# Altium PCB PCB2.PcbDoc
Units mil, origin at the board's own origin, x right, y up, seen from the top; angles counter-clockwise.
Board outline 6000 x 4000 mil, 2 copper layers (Top Layer, Bottom Layer); 13 components, 7 nets, 29 pads, 0 vias.
Unrouted connection lines stored in the file: 7.
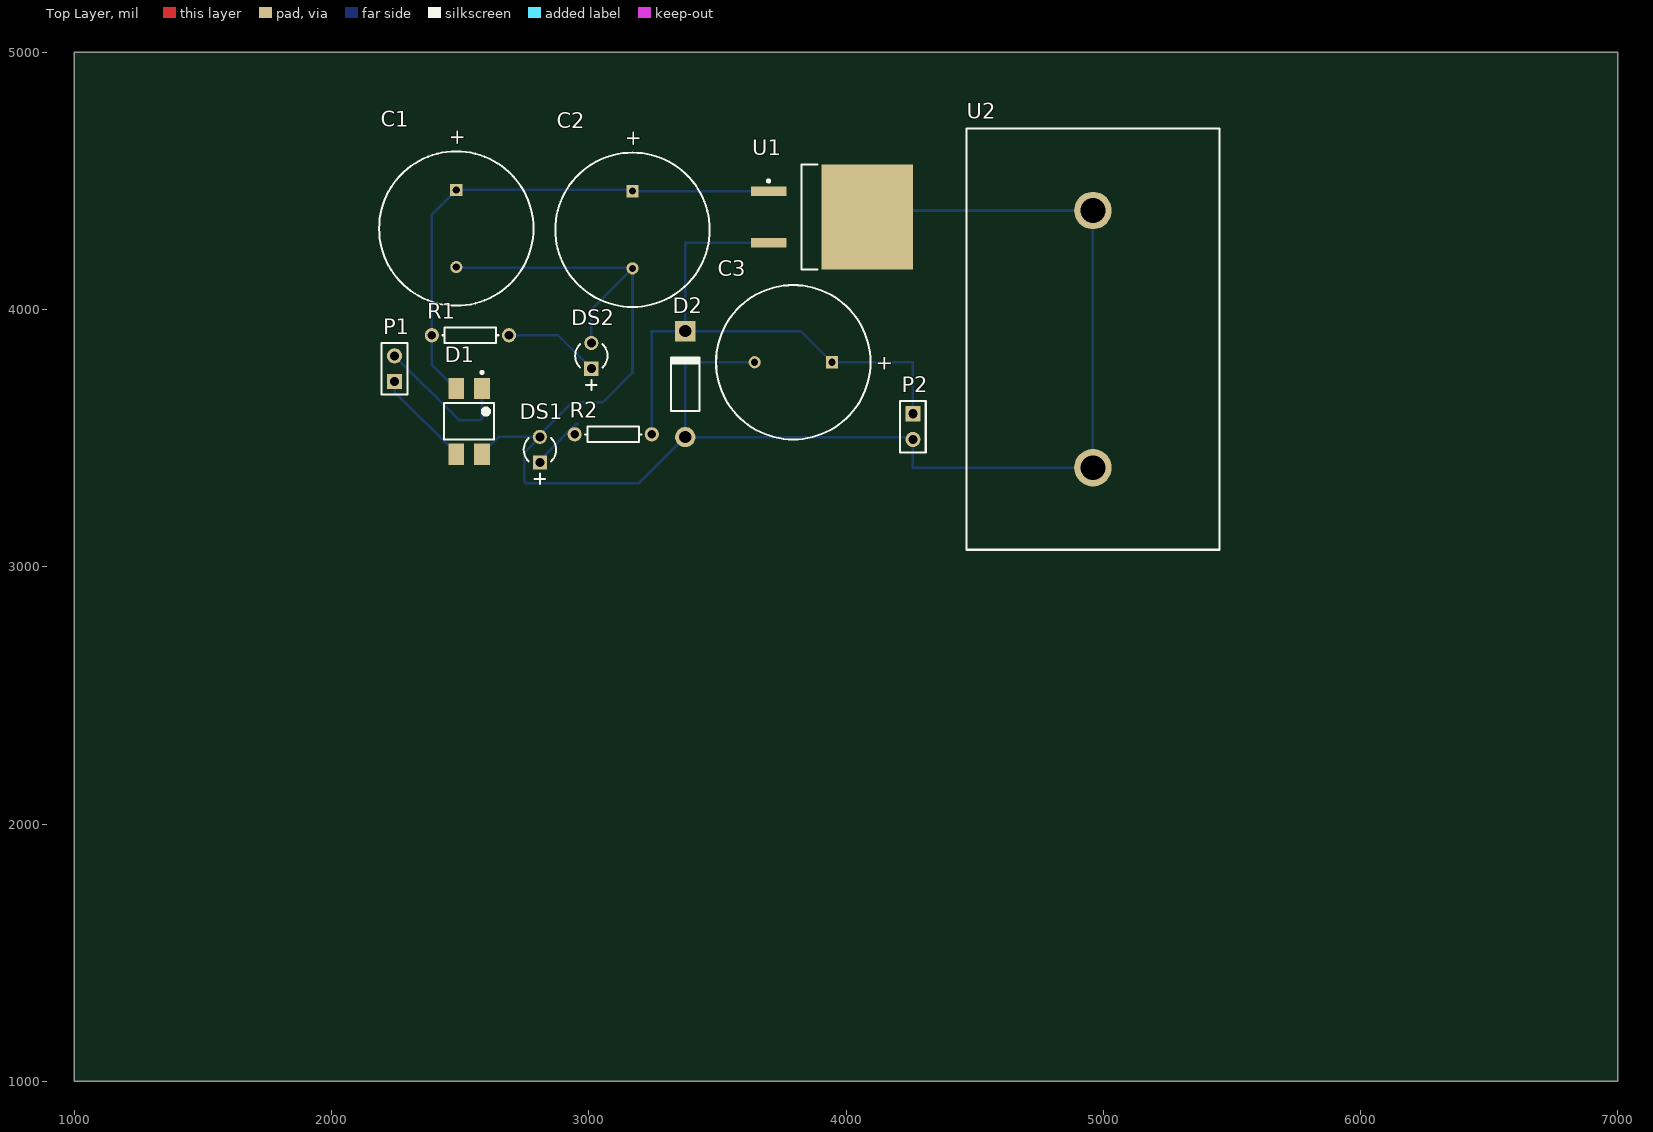
[diagram p0: Top Layer view]
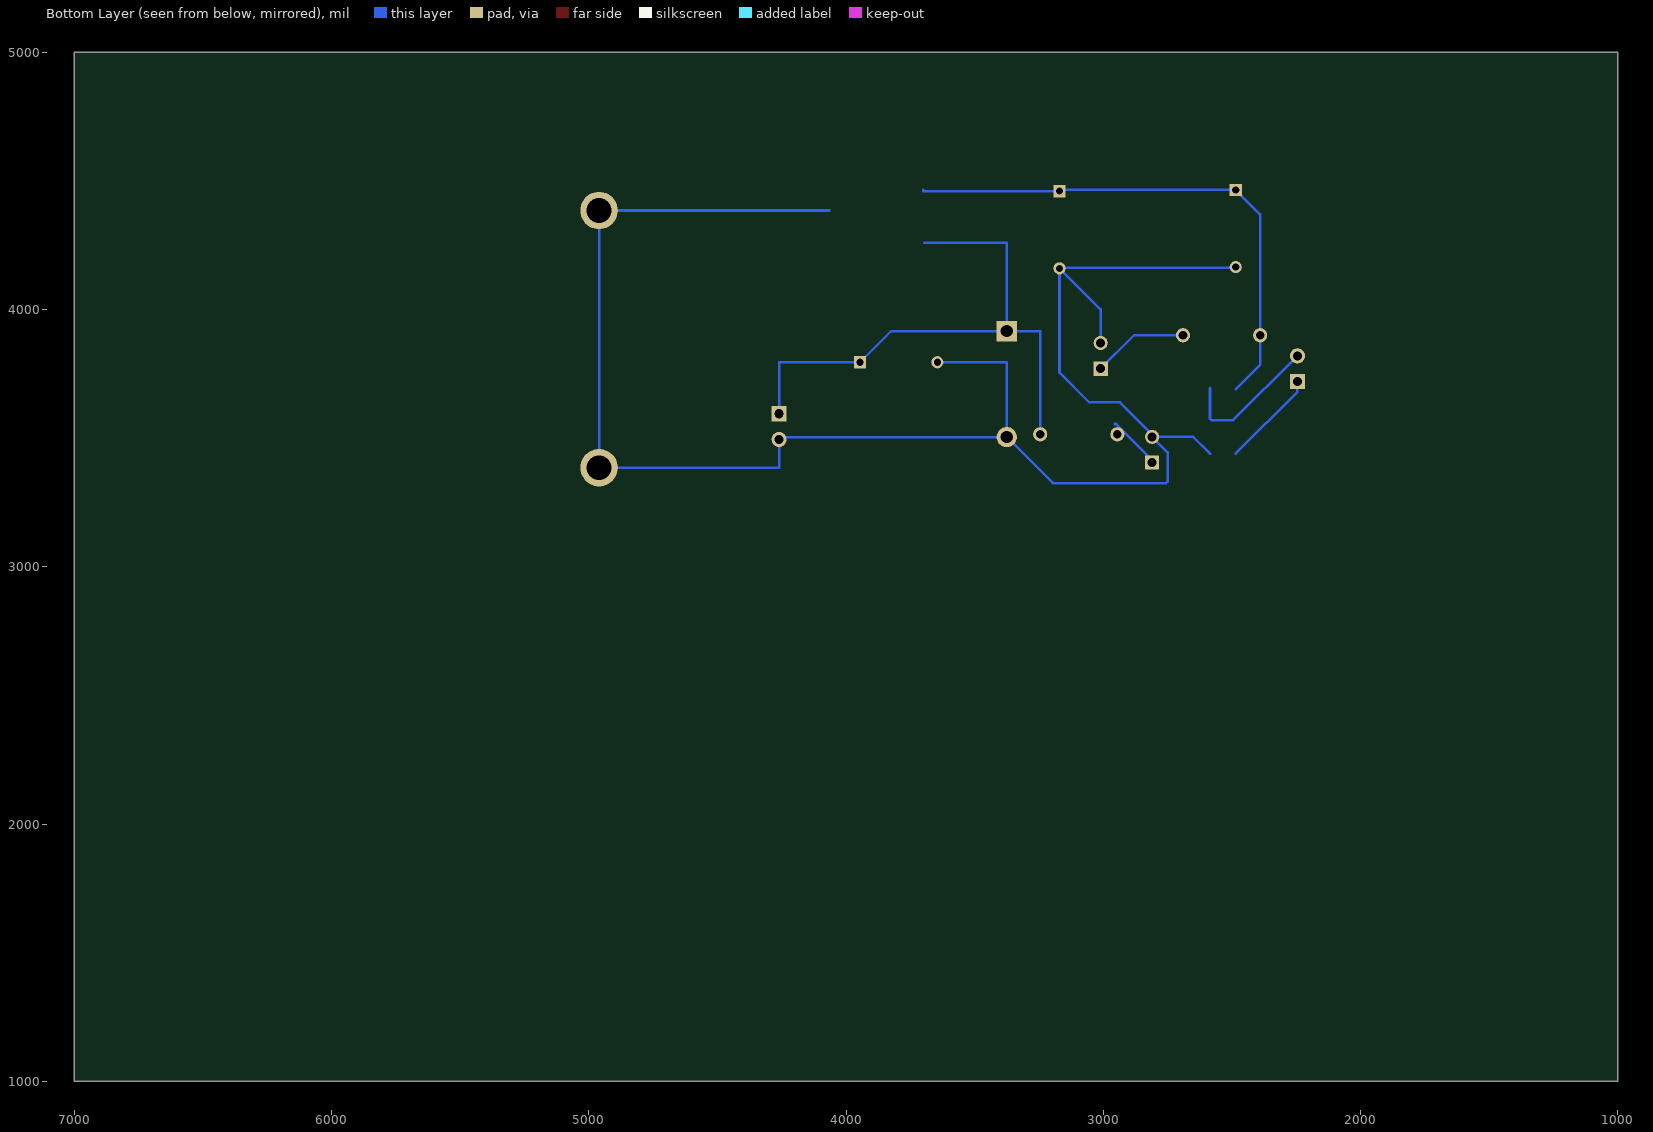
[diagram p1: Bottom Layer view, seen from below]

## Layer stack, top to bottom
Top Solder: solder mask 0.4, Solder Resist, Dk 3.5
Top Layer: signal copper 1.4
Dielectric 1: dielectric 12.6, FR-4, Dk 4.8
Bottom Layer: signal copper 1.4
Bottom Solder: solder mask 0.4, Solder Resist, Dk 3.5

## Board outline
1000,1000 7000,1000 7000,5000 1000,5000

## Design rules (kind name [scope] priority, off if disabled: settings)
Clearance [All] p1: gap=10 ignorepadtopadclearanceinfootprint=FALSE
PolygonConnect [All] p1: connectstyle=Relief reliefconductorwidth=10 reliefentries=4 polygonreliefangle="90 Angle" airgapwidth=10
RoutingVias [All] p1: holewidth=28 width=50 viastyle="Through Hole" minholewidth=28 minwidth=50 maxholewidth=28 maxwidth=50
SolderMaskExpansion [All] p1: expansion=0 istentingtop=FALSE
SupplyNets "Schematic Supply Nets" [InNet('GND')] p1: voltage=0.000
Width [All] p1: maxlimit=10 minlimit=10 preferedwidth=10
30 further rules are at their usual default settings.

## Components (designator, comment, footprint, x,y, rotation, side; value= is the part's Value field where it differs from the comment)
C1 "Cap Pol1" RB7.6-15 2485,4315 r90 top value=4700µF
C2 "Cap Pol1" RB7.6-15 3170,4310 r90 top value=100nF
C3 "Cap Pol1" RB7.6-15 3795,3795 r0 top value=100nF
D1 "MB10S" FP-751EP-MFG 2535,3565 r270 top
D2 "1N4007" DO-41 3375,3710 r90 top
DS1 "WP710A10QBC/D" KING-WP710A10QBCD_V 2810,3455 r90 top
DS2 "WP710A10QBC/D" KING-WP710A10QBCD_V 3010,3820 r90 top
P1 "Header 2" HDR1X2 2245,3720 r90 top
P2 "CONN_TH" HDR1X2 4260,3595 r270 top
R1 "Res1" AXIAL-0.3 2540,3900 r180 top value=540
R2 "Res1" AXIAL-0.3 3095,3515 r0 top value=220
U1 "L7808ABD2T-TR" TO-263_L 3945,4360 r0 top
U2 "FA-T220-38E" FP-FA-T220-38E-MFG 4960,3885 r90 top

## Footprints (in the part's own frame and the unit in brackets; to place one, negate y for a bottom-side part, rotate by r counter-clockwise, add the part's x,y. Pads: shape width x height; smd on the part's side, far side on the other; paste and mask are expansions set on the pad)
AXIAL-0.3 [mm] "Axial Device, Thru-Hole; 2 Leads; 0.3 in Pin Spacing"
  round 1.4 hole 0.85: 1(-3.81,0) 2(3.81,0)
  silkscreen extent -2.77,-0.76 2.77,0.76
DO-41 [mm] "Diode, Axial; Body 5.2 x 2.7 mm (LxDia. max), Lead Dia. 0.86 mm (max)"
  round 2 hole 1.2: 1(-5.23,0)
  rect 2x2 hole 1.2: 2(5.23,0)
  silkscreen extent -2.65,-1.4 2.75,1.4
FP-751EP-MFG [mm]
  rect 2.1x1.55 smd paste+0 mask+0: 1(-3.25,1.27) 2(-3.25,-1.27) 3(3.25,-1.27) 4(3.25,1.27)
  silkscreen extent -4.97,-2.47 1.8,2.47, body extent -4.4,-2.58 4.4,2.58, height 0.25
FP-FA-T220-38E-MFG [mm]
  round 3.7 hole 2.45 paste-2539.97 mask+0: 1(-12.7,0) 1(12.7,0)
  silkscreen extent -20.8,-12.5 20.8,12.5, body extent -20.9,-12.6 20.9,12.6, height 0.25
HDR1X2 [mm] "Connector; Header; 2 Position"
  rect 1.5x1.5 hole 0.9: 1(0,0)
  round 1.5 hole 0.9: 2(2.54,0)
  silkscreen extent -1.27,-1.27 3.81,1.27
KING-WP710A10QBCD_V [mm] "THD, 2-Leads, Dia 3.2mm"
  rect 1.4x1.4 hole 0.889 paste-2539.97 mask+0.064: 1(-1.27,0)
  round 1.4 hole 0.889 paste-2539.97 mask+0.064: 2(1.27,0)
  silkscreen extent -3.39,-1.6 1.16,1.6
RB7.6-15 [mm] "Polarized Capacitor (Radial); 2 Leads"
  rect 1.2x1.2 hole 0.7: 1(3.81,0)
  round 1.2 hole 0.7: 2(-3.81,0)
  silkscreen extent -7.62,-7.62 7.62,7.62
TO-263_L [mm] "D2-PAK, 4-Leads, Body 9.2x10.2mm, Pitch 2.54mm, Lead Span 15.4mm, IPC High Density"
  rect 3.5x0.95 smd: 1(-6.25,2.54) 3(-6.25,-2.54)
  rect 9x10.35 smd: 4(3.5,0)
  silkscreen extent -6.37,-5.2 -1.4,5.2, body extent -3,-5.2 6.35,5.2, height 4.6

## Part data
C1 C2 C3: "Polarized Capacitor (Radial)", LatestRevisionDate=17-Jul-2002, LatestRevisionNote="Re-released for DXP Platform.", PackageDescription="Polarized Capacitor (Radial); 2 Leads", PackageReference=RB7.6-15, Published=8-Jun-2000, Publisher="Altium Limited"
D1: library part CMP-07163-000045-1, "BRIDGE RECT 1P 1KV 500MA 4SOIC", Average Rectified Current=500mA, Capacitance=470pF, Case Code (Imperial)=1206, Case Code (Metric)=3216, Case/Package=SOIC, Forward Current=800mA, Forward Voltage=1V, Max Forward Surge Current (Ifsm)=35A, Max Operating Temperature=150°C, Max Power Dissipation=1.4W, Max Repetitive Reverse Voltage (Vrrm)=1kV, Min Operating Temperature=-55°C, Package Quantity=500, Peak Reverse Current=5uA, Tolerance=10%, Voltage Rating=500V, Contact Plating=Tin, Element Configuration=Single, Height=2.7mm, Height - Seated (Max)=0.354inch, Lead Free="Lead Free", Lead Pitch=0.197inch, Lead/Base Style="Formed Leads", Length=4.95mm, Max Surge Current=35A, Mount="Surface Mount", Number of Elements=1, Number of Pins=4, Packaging="Tape and Reel", Peak Non-Repetitive Surge Current=35A, Radiation Hardening=No, REACH SVHC="No SVHC", Reverse Voltage (DC)=1kV, Thickness=0.039inch, Weight=0.228g, Width=4.2mm
D2: library part "Diode 1N4007", "1 Amp General Purpose Rectifier", Code_JEDEC=DO-204-AL, ComponentLink1Description="Manufacturer Link", ComponentLink1URL=http://www.fairchildsemi.com/, ComponentLink2Description=Datasheet, ComponentLink2URL=http://www.fairchildsemi.com/ds/1N%2F1N4001.pdf, DatasheetVersion=1998, LatestRevisionDate=17-Jul-2002, LatestRevisionNote="Re-released for DXP Platform.", PackageDescription="Diode, Axial; Body 5.2 x 2.7 mm (LxDia. max), Lead Dia. 0.86 mm (max)", PackageReference=DO-41, PackageVersion=Aug-1999, Published=8-Jun-2000, Publisher="Altium Limited"
DS1 DS2: library part CMP-2000-07416-1, "Blue LED, 3.3 V, 20 mA, -40 to 85 degC, 2-Pin THD, RoHS, Bulk", Forward Current=20mA, Forward Voltage=3.3V, Illumination Color=Blue, Lens Color/Style=WaterClear, Manufacturer=Kingbright, Maximum Operating Temperature=+85C, Minimum Operating Temperature=-40C, Package Description="2-Pin Through Hole Device, Dia 3.2 mm", Package Reference=WP710A10QBCD, Wavelength/Color Temperature=470nm, Datasheet URL=https://datasheet.ciiva.com/2121/wp710a10qbc-d-2121617.pdf, Datasheet Version="Rev. 5B, 09/2014", Factory Pack Quantity=500, LED Size=T-1, Lens Dimensions=3mmx4.6mm, Lens Shape=Dome, Luminous Intensity=1600mcd, Manufacturer URL=http://www.kingbright.com/, Mounting Style=ThroughHole, Mounting Technology=ThroughHole, Packaging=Bulk, Product Category=StandardLEDs-ThroughHole, RoHS=Details, Type=SolidStateLEDLamp, Viewing Angle=20deg
P1: "Header, 2-Pin", LatestRevisionDate=17-Jul-2002, LatestRevisionNote="Re-released for DXP Platform.", Publisher="Altium Limited"
P2: library part "Header 2", "Header, 2-Pin", LatestRevisionDate=17-Jul-2002, LatestRevisionNote="Re-released for DXP Platform.", Publisher="Altium Limited"
R1 R2: "Resistor", LatestRevisionDate=17-Jul-2002, LatestRevisionNote="Re-released for DXP Platform.", PackageDescription="Axial Device, Thru-Hole; 2 Leads; 0.3 in Pin Spacing", PackageReference=AXIAL-0.3, Published=8-Jun-2000, Publisher="Altium Limited"
U1: library part CMP-0244-00207-1, "Positive Voltage Regulator, 3-Pin D2PAK, Tape and Reel", ComponentLink1Description="Manufacturer URL", ComponentLink1URL=http://www.st.com, ComponentLink2Description=Datasheet, ComponentLink2URL=http://www.st.com/internet/com/TECHNICAL_RESOURCES/TECHNICAL_LITERATURE/DATASHEET/CD00000444.pdf, DatasheetVersion=16/11/2011, PackageDescription="3-Pin Transistor Outline Package 2.54 mm Pitch, 15.4 mm Lead Span (D2PAK)", PackageReference=TO-263, PackageVersion=2011
U2: library part CMP-33535-000020-1, "HEATSINK TO-218,TO-220,TO-247", Case/Package=TO-220, Color=Black, Natural Thermal Resistance=3.8°C/W, Package Quantity=10, Thermal Resistance @ Forced Air Flow (100 LFM)=1.5°C/W, Finish=Anodized, Height=38.1mm, Height Off Base=0.984inch, Length=41.6mm, Material=Aluminium, Mount=Bolt, Package Cooled=TO-220, Packaging=Bulk, RoHS Compliant=Yes, Series=F, Shape=Fins, Type=Passive, Weight=27g, Width=25mm

## Nets (pads, with @x,y where several pads share a name; then routed paths per layer and width w, separated by ;. In a path a pad name is that pad's centre, name@x,y a point inside that pad or via, vN(x,y) a via of type N, cw(c..) or ccw(c..) an arc to the next point about the centre after c; other vN are vias at no path point)
GND: C1.2 C2.2 C3.2 D1.4 D2.1 DS1.2 DS2.2 P2.2 U1.4 U2.1 | length 7220.3
  Bottom Layer w10: C1.2 2487.5,4162.5 3167.5,4162.5 C2.2 ; 2585,3440 2650,3505 DS1.2 2750,3445 2750,3330.86 2755.86,3325 3195.91,3325 D2.1 ; DS1.2@2810,3515 2934.32,3639.32 3054.32,3639.32 3170,3755 C2.2 ; DS2.2 3010,4000 C2.2 ; C3.2 3375,3795 D2.1 ; 4065,4385 4960,4385 4960,3385 4260,3385 P2.2 4260,3504.09 D2.1
NetC1_1: C1.1 C2.1 D1.2 R1.2 U1.1 | length 2075.8
  Bottom Layer w10: 2485,3690 2390,3785 R1.2 2390,4370 C1.1 3165,4465 C2.1 3700,4460 3700,4465
NetC3_1: C3.1 D2.2 P2.1 R2.2 U1.3 | length 2330.1
  Bottom Layer w10: R2.2 3245,3915.91 D2.2 ; 3695,4260 3375,4260 D2.2 ; P2.1 4260,3795 C3.1 3824.09,3915.91 D2.2
NetD1_1: D1.1 P1.2 | length 565.1
  Bottom Layer w10: P1.2 2495,3570 2579.14,3570 2585,3575.86 2585,3695
NetD1_3: D1.3 P1.1 | length 379.4
  Bottom Layer w10: P1.1 2245,3680 2485,3440
NetDS1_1: DS1.1 R2.1 | length 203
  Bottom Layer w10: DS1.1@2810,3415 2950,3555 2955,3555
NetDS2_1: DS2.1 R1.1 | length 373.8
  Bottom Layer w10: R1.1 2880,3900 DS2.1

## Text inside footprints (layer, text, board x,y; h text height)
C1: Top Overlay "+" at 2514.01,4635.15 h59.06 r90
C2: Top Overlay "+" at 3199.01,4630.15 h59.06 r90
C3: Top Overlay "+" at 4115.15,3765.99 h59.06